# Altium PCB VA_HUB_PCB.PcbDoc (part 10 of 12)
Units mil, origin at the board's own origin, x right, y up, seen from the top; angles counter-clockwise.
Board outline 4408 x 3619 mil, 8 copper layers (Top Layer, Routing 1, Routing 2, Power Plane, GND Plane, Routing 3, Routing 4, Bottom Layer), stack 85.156 mil thick; 569 components, 440 nets, 2911 pads, 1518 vias.
Unrouted connection lines stored in the file: 46.
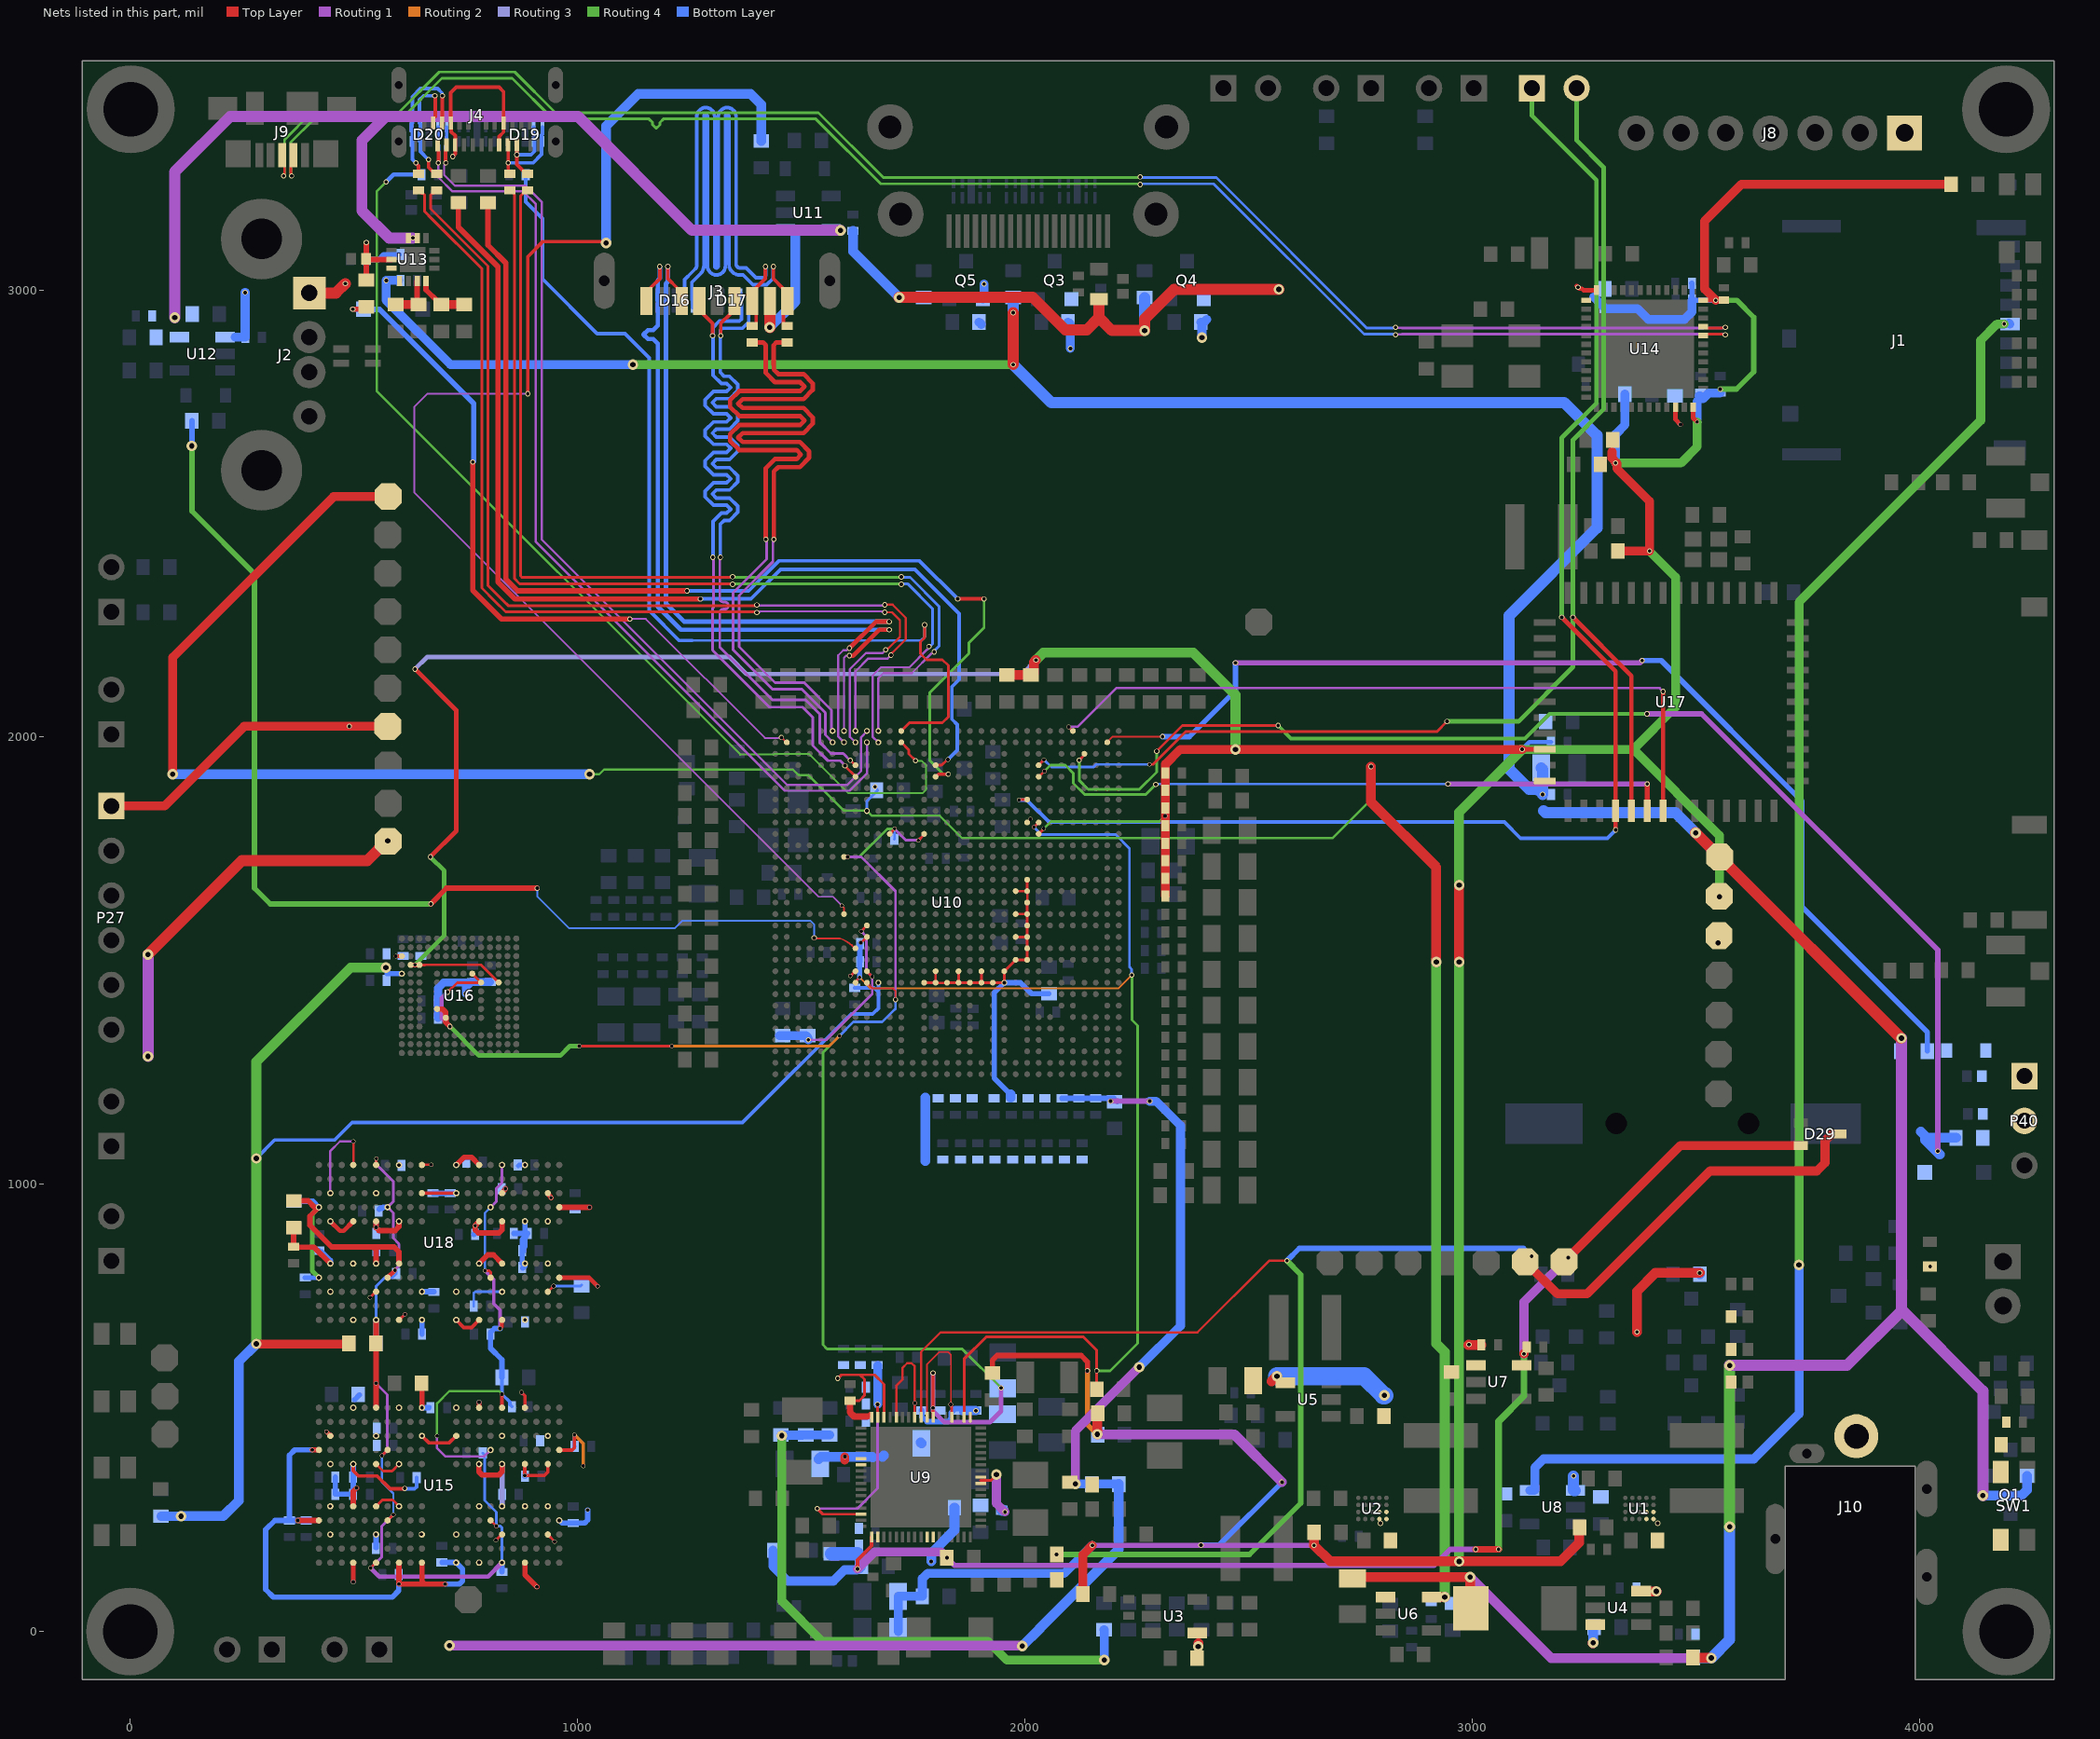
[diagram p13: the nets of this part, all layers, seen from the top]

## Via types
v1: diameter 9.84, hole 7.87, Top Layer to Bottom Layer, 821 vias
v2: diameter 11.81, hole 7.87, Top Layer to Bottom Layer, 575 vias
v3: diameter 23.62, hole 11.81, Top Layer to Bottom Layer, 122 vias

## Nets (pads, with @x,y where several pads share a name; then routed paths per layer and width w, separated by ;. In a path a pad name is that pad's centre, name@x,y a point inside that pad or via, vN(x,y) a via of type N, cw(c..) or ccw(c..) an arc to the next point about the centre after c; other vN are vias at no path point) (continued)
TYPEC0_RX2_N: D20.1 D20.10 J4.A10 U10.AL23 | length 2183.5
  Top Layer w8: v2@705.36,3284.43 J4.A10@705.36,3310.64
  Routing 1 w5: v2(705.86,3283.93) 705.86,3282.09 701.86,3278.09 701.86,3256.96 725.82,3233 884.03,3233 920,3197.03 920,2442 1469,1893 1602.89,1893 1634.05,1924.16 1634.05,1999.83 1647.05,2012.83 v1(1647.05,2013.92)
  Bottom Layer w8: v2(705.86,3283.93) 704.86,3284.93 704.86,3321.42 707.69,3324.25 D20.1@707.69,3332 D20.10@707.69,3363.5
TYPEC0_RX2_P: D20.2 D20.9 J4.A11 U10.AK23 | length 2189.2
  Top Layer w8: v2@689.36,3287.13 J4.A11@689.36,3310.09
  Routing 1 w5: v2(688.86,3283.93) 688.86,3251.58 720.44,3220 878.64,3220 907,3191.64 907,2436.62 1463.62,1880 1608.27,1880 1647.05,1918.78 v1(1647.05,1988.08)
  Bottom Layer w8: D20.9@688,3363.5 D20.2@688,3332 688,3324.25 D20.2@688.86,3323.39 ; v2@689.86,3283.93 D20.2@689.86,3323.39
TYPEC0_SBU1: C167.1 U10.AK20 | length 2303.2
  Top Layer w6: U10.AK20@1723.82,1988.18 1741,1971.01 1741,1962 v2(1756,1947)
  Routing 4 w4: 1364,1961 1438.7,1961 1439.7,1962 1518,1962 1605,1875 1772,1875 1779.5,1882.5 1779.5,1936.5 1769,1947 v2(1756,1947)
  Routing 4 w5: v2(572,3241) 551,3220 551,2774 1364,1961
  Bottom Layer w10: v2(572,3241) 588.82,3257.82 C167.1@651.32,3257.82
TYPEC0_SBU1_DC: R86.1 U10.AH17 | length 2378.1
  Top Layer w6: U10.AH17@1800.59,1937 1813.95,1937 1825.79,1948.85 1827.26,1948.85 v1(1828,1949.58)
  Top Layer w12: R86.1@733.82,3194.82 733.82,3140.18 822.39,3051.61 822.39,2346.57 860.18,2308.78 v2@1274.22,2308.78
  Bottom Layer w8: v2(1275,2309) 1388.07,2309 1454.07,2375 1754,2375 1853,2276 1853,2128.5 1837,2112.5 1837,2040 1849,2028 1849,1970.58 1841.58,1963.17 v1(1828,1949.58)
TYPEC0_SBU2: C168.1 U10.AL20 | length 2174.2
  Top Layer w6: U10.AL20@1723.82,2013.77 1742.05,2032 1816,2032 1829,2045 1829,2160 1816,2173 1780,2173 1767,2186 1767,2213.39 1776,2222.39 v2(1776,2251)
  Bottom Layer w6: 1256,2216 1768.31,2216 1776,2223.69 v2(1776,2251)
  Bottom Layer w8: C168.1@884.32,3257.82 884.32,3196.68 921.56,3159.44 921.56,3024.44 1044,2902 1106,2902 1160,2848 1160,2283 1227,2216 1256,2216
TYPEC0_SBU2_DC: R87.1 U10.AG17 | length 2497.7
  Top Layer w8: U10.AG17@1800.59,1911.41 1801.95,1911.41 1807.53,1917 v2(1829,1917) ; v2(1850,2309) v2(1909,2309)
  Top Layer w12: R87.1@799.82,3194.82 799.82,3100.18 840,3060 840,2353 866.22,2326.78 v2(1245,2326.78)
  Routing 4 w6: v2(1829,1917) 1828.96,1917.04 1817.96,1917.04 1787.93,1947.07 1787.93,2099.93 1875,2187 1875,2210.78 1909,2244.78 v2(1909,2309)
  Bottom Layer w8: v2(1245,2326.78) 1382.78,2326.78 1450,2394 1765,2394 v2(1850,2309)
TYPEC0_TX1_N: C169.1 U10.AK22 | length 2230.5
  Top Layer w6: C169.1@848.82,3222.32 852.32,3222.32 858.32,3216.32 858.32,3213.48 859,3212.81 859,2354.49 870.72,2342.78 1339,2342.78 1339.15,2342.63 1345.9,2342.63 v2(1346.85,2341.68)
  Routing 1 w5: v1(1672.64,1987.93) 1672.64,1988.18 1659.64,2001.18 1659.64,2137.03 1678.62,2156 1742.21,2156 1782.62,2196.42
  Routing 4 w6: v2(1346.85,2341.68) 1347.8,2342.63 1352.07,2342.63 1352.37,2342.92 1525.26,2342.92 1716,2342.92 1716.29,2342.63 1722.89,2342.63 v2(1724,2341.52)
  Bottom Layer w6: v2(1724,2341.52) 1725.11,2342.63 1729.22,2342.63 1729.51,2342.92 1737.91,2342.92 1794.05,2286.77 1794.05,2208.67 1790.54,2205.15 1790.23,2205.15 1787.33,2202.24 v2(1785.76,2202.24)
TYPEC0_TX1_P: C170.1 U10.AL22 | length 2203.1
  Top Layer w6: C170.1@888.82,3222.32 885.32,3222.32 873,3210 873,2360.29 876.51,2356.78 1339,2356.78 1339.6,2357.38 1345.89,2357.38 v2(1347,2358.49)
  Routing 1 w5: v1(1672.64,2013.77) 1672.81,2013.94 1672.81,2019.64 1672.64,2019.81 1672.64,2131.64 1684,2143 1747.59,2143 1791.82,2187.23
  Routing 4 w6: v2(1347,2358.49) 1348.11,2357.38 1352.06,2357.38 1352.52,2356.92 1519.46,2356.92 1716,2356.92 1716.29,2357.22 1722.89,2357.22 v2(1724,2358.33)
  Bottom Layer w6: v2(1724,2358.33) 1725.11,2357.22 1729.22,2357.22 1729.51,2356.92 1743.7,2356.92 1808.05,2292.57 1808.05,2202.87 1800.55,2195.36 1800.55,2194.84 1797.64,2191.93 v2(1797.64,2190.36)
TYPEC0_TX2_N: C171.1 U10.AK24 | length 2262.9
  Top Layer w5: v2(1687,2279) 1703,2279 1720.85,2261.15 1720.85,2224.15 1694.83,2198.13 1693.97,2198.13 1690.84,2195 v2(1689,2195)
  Top Layer w6: C171.1@644.82,3221.5 650.82,3215.5 654.4,3215.5 657.91,3211.99 657.91,3175.47 675.36,3158.02 786,3047.38 786,2333.2 815.1,2304.1 839.2,2280 v2@1401,2280
  Routing 1 w5: v2(1401,2278.59) 1402.3,2279.9 1406.73,2279.9 1407.94,2281.1 1680.67,2281.1 1681.46,2280.3 1685.7,2280.3 v2(1687,2279) ; v1(1621.46,1988.08) 1621.46,1988.18 1609,2000.64 1609,2152 1645,2188 1682,2188 v2(1689,2195)
TYPEC0_TX2_P: C172.1 U10.AL24 | length 2233.4
  Top Layer w5: v2(1687,2295.81) 1704.57,2295.81 1733.85,2266.54 1733.85,2218.77 1704.02,2188.94 1704.02,2188.09 1700.89,2184.96 v2(1700.89,2183.11)
  Top Layer w6: C172.1@685,3221.5 679,3215.5 675.43,3215.5 671.91,3211.99 671.91,3181.27 689.36,3163.82 800,3053.18 800,2339 834.9,2304.1 845,2294 v2@1401,2294
  Routing 1 w5: v2(1401,2295.41) 1402.3,2294.1 1680.67,2294.1 1681.07,2294.51 1685.7,2294.51 v2(1687,2295.81) ; v1(1621.46,2013.92) 1621.46,2146.84 1650.16,2175.54 1693.31,2175.54 v2(1700.89,2183.11)
TYPEC0_U2VBUSDET: D22.2 R85.1 U10.AK30 | length 1651.7
  Top Layer w4: v2(1456,1999) 1456.55,1999 1467.37,1988.18 U10.AK30@1467.92,1988.18
  Top Layer w12: v2(497.82,2956.82) 522.82,2956.82 R85.1@527.82,2961.82 ; v2(766,2615) 766,2328 830,2264 v2@1116.83,2264
  Routing 1 w4: v2(1117,2264) 1153,2264 1419,1998 1455,1998 v2(1456,1999)
  Bottom Layer w12: v2(497.82,2956.82) D22.2@521.88,2956.82 522.28,2956.42 557.58,2956.42 768,2746 768,2617 v2(766,2615)
TYPEC0TX1_N: C169.2 D19.1 D19.10 J4.A3 | length 210
  Top Layer w8: J4.A3@844.72,3323.89 845.1,3323.51 v2(845.1,3284) 845.1,3263.05 C169.2@848.82,3259.32
  Bottom Layer w8: v2(845.1,3284) 900.63,3284 919.84,3303.21 919.84,3345.91 921.68,3347.75 D19.10@921.68,3363.5
TYPEC0TX1_P: C170.2 D19.2 D19.9 J4.A2 | length 173.8
  Top Layer w8: J4.A2@864.41,3323.89 v2(864.41,3302.07) 864.41,3280.24 885.32,3259.32 C170.2@888.82,3259.32
  Bottom Layer w8: v2(864.41,3302.07) 896.07,3302.07 903.84,3309.84 903.84,3332 903.84,3345.91 902,3347.75 D19.9@902,3363.5
TYPEC0TX2_N: C171.2 D20.5 D20.6 J4.B3 | length 325.7
  Top Layer w8: v2(638.69,3283.93) 638.69,3283.62 644.82,3277.48 C171.2@644.82,3259.32 ; J4.B3@697.08,3373.11 698,3374.02 v2(698,3434)
  Bottom Layer w8: v2(638.69,3283.93) 630.79,3291.83 630.79,3332 630.79,3353.91 628.94,3355.75 628.94,3371.24 630.79,3373.09 630.79,3431.74 649.05,3450 687.63,3450 697.27,3440.36 697.27,3434.73 v2(698,3434)
TYPEC0TX2_P: C172.2 D20.4 D20.7 J4.B2 | length 295.9
  Top Layer w8: v2(667,3291) 667,3273.82 681.5,3259.32 C172.2@685,3259.32 ; J4.B2@678.32,3362.34 678.32,3383.87 682,3387.55 682,3433 v2(681,3434)
  Bottom Layer w8: D20.4@646.79,3332 646.79,3353.91 648.63,3355.75 D20.7@648.63,3363.5 648.63,3371.24 646.79,3373.09 646.79,3425.11 655.68,3434 v2(681,3434) ; D20.4@648.63,3332 648.63,3309.37 v2(667,3291)
TYPEC1_N: D17.1 D17.10 J3.2 U10.AH24 | length 1744.3
  Top Layer w6: v2(1609.89,1947.89) 1610.23,1947.89 1621.12,1937 U10.AH24@1621.46,1937
  Top Layer w8: v2(1320.11,2897.57) 1320.11,2924.77 J3.2@1341.41,2946.07
  Routing 1 w6: v2(1319.52,2402) 1318.4,2400.89 1318.4,2396.78 1318.11,2396.49 1318.11,2365 1318.11,2310 ccw(c1326.11,2310) 1326.11,2302 1329,2302 cw(c1329,2294) 1329,2286 1326.11,2286 ccw(c1326.11,2278) 1318.11,2278 1318.11,2259 1318.11,2200.89 1436,2083 1509.8,2083 1542,2050.8 1542,1987.8 1566.7,1963.1 1594.1,1963.1 1609.31,1947.89 v2(1609.89,1947.89)
  Bottom Layer w8: 1319.11,2408 1319.11,2432.91 1319.11,2475.59 1328.11,2484.59 1340.11,2484.59 1358.48,2502.97 1358.48,2516.22 1340.11,2534.59 1310.57,2534.59 1301.57,2543.59 1310.57,2552.59 1340.11,2552.59 1358.48,2570.97 1358.48,2584.22 1340.11,2602.59 1310.57,2602.59 1301.57,2611.59 1310.57,2620.59 1340.11,2620.59 1358.48,2638.97 1358.48,2652.22 1340.11,2670.59 1310.57,2670.59 1301.57,2679.59 1310.57,2688.59 1340.11,2688.59 1358.48,2706.97 1358.48,2720.22 1340.11,2738.59 1310.57,2738.59 1301.57,2747.59 1310.57,2756.59 1340.11,2756.59 1358.48,2774.97 1358.48,2788.22 1340.11,2806.59 1328.11,2806.59 1319.11,2815.59 1319.11,2871 1319.11,2893.88 1320.11,2894.88 v2(1320.11,2897.57) 1319.11,2898.57 1319.11,2909.26 1323.8,2913.95 1368.61,2913.95 1382.67,2928.01 1382.67,2974.23 1384.51,2976.07 D17.10@1384.51,2991.82
TYPEC1_P: D17.2 D17.9 J3.3 U10.AG24 | length 1750.5
  Top Layer w6: v2(1598,1936) 1598,1935.44 1621.46,1911.98 U10.AG24@1621.46,1911.41
  Top Layer w8: J3.3@1282.23,2944.65 1302.11,2924.77 v2(1302.11,2897.57)
  Routing 1 w6: v2(1302.7,2402) 1303.82,2400.89 1303.82,2396.78 1304.11,2396.49 1304.11,2289.94 1302.11,2287.94 1302.11,2194.26 1429.37,2067 1503.17,2067 1526,2044.17 1526,1981.17 1560.07,1947.1 1587.47,1947.1 1598,1936.57 v2(1598,1936)
  Bottom Layer w8: 1303.11,2408 1303.11,2432.91 1303.11,2482.22 1321.48,2500.59 1333.48,2500.59 1342.48,2509.59 1333.48,2518.59 1303.94,2518.59 1285.57,2536.97 1285.57,2550.22 1303.94,2568.59 1333.48,2568.59 1342.48,2577.59 1333.48,2586.59 1303.94,2586.59 1285.57,2604.97 1285.57,2618.22 1303.94,2636.59 1333.48,2636.59 1342.48,2645.59 1333.48,2654.59 1303.94,2654.59 1285.57,2672.97 1285.57,2686.22 1303.94,2704.59 1333.48,2704.59 1342.48,2713.59 1333.48,2722.59 1303.94,2722.59 1285.57,2740.97 1285.57,2754.22 1303.94,2772.59 1333.48,2772.59 1342.48,2781.59 1333.48,2790.59 1321.48,2790.59 1303.11,2808.97 1303.11,2871 1303.11,2896.57 v2(1302.11,2897.57) 1302.11,2900.26 1303.11,2901.26 1303.11,2915.89 1317.17,2929.95 1361.98,2929.95 1366.67,2934.63 1366.67,2974.23 1364.82,2976.07 D17.9@1364.82,2991.82
TYPEC1_RX1_N: D16.5 D16.6 J3.5 U10.AL25 | length 1723.2
  Top Layer w8: J3.5@1154.34,2974.89 1164.12,2984.66 1164.12,3005.12 1184,3025 v2(1184,3052.2)
  Top Layer w10: v2(1608,2182) 1608.28,2181.72 1616.36,2181.72 1674.64,2240 v2(1697,2240)
  Routing 1 w5: v1(1595.87,2013.92) 1595.87,2106.11 1595.94,2106.17 1595.94,2177.34 1600.6,2182 v2(1608,2182)
  Bottom Layer w10: v2(1184,3052.2) 1184,3025.48 1179.61,3021.09 1179.61,2992.66 D16.6@1178.77,2991.82 1178.77,2976.07 1179.61,2975.23 1179.61,2926 1179.61,2920 1169.61,2910 1157.38,2910 1147.38,2900 1157.38,2890 1169.61,2890 1179.61,2880 1179.61,2875 1179.61,2830 1179.61,2675.21 1179.61,2291.54 1231.15,2240 v2(1697,2240)
TYPEC1_RX1_P: D16.4 D16.7 J3.6 U10.AK25 | length 1725.4
  Top Layer w8: v2(1202,3052.2) 1202,3025 1223.3,3003.7 1223.3,2984.66 J3.6@1233.08,2974.89 J3.6@1233.08,2957.17
  Top Layer w10: v2(1608,2198.81) 1667.19,2258 v2(1697,2258)
  Routing 1 w5: v1(1595.87,1988.08) 1595.87,1988.18 1583,2001.05 1583,2093.24 1582.87,2093.24 1582.87,2111.49 1582.94,2111.56 1582.94,2182.72 1594.44,2194.22 1601.67,2194.22 1606.25,2198.81 v2(1608,2198.81)
  Bottom Layer w10: v2(1202,3052.2) 1202,3018.02 1197.61,3013.63 1197.61,2992.66 D16.7@1198.45,2991.82 1198.45,2976.07 1197.61,2975.23 1197.61,2830 1197.61,2675.21 1197.61,2299 1238.61,2258 v2(1697,2258)
TYPEC1_TX1_N: C159.1 U10.AK26 | length 1800.1
  Top Layer w10: C159.1@1390.82,2882.32 1414.96,2882.32 1420.82,2876.46 1420.82,2832 1420.82,2824.42 1420.91,2824.33 1420.91,2814.27 1441.46,2793.73 1497.79,2793.73 1507.79,2783.73 1497.79,2773.73 1361.63,2773.73 1341.09,2753.18 1341.09,2738.27 1361.63,2717.73 1497.79,2717.73 1507.79,2707.73 1497.79,2697.73 1361.63,2697.73 1341.09,2677.18 1341.09,2662.27 1361.63,2641.73 1489.68,2641.73 1499.68,2631.73 1489.68,2621.73 1441.46,2621.73 1420.91,2601.18 1420.91,2462.21 1421,2462.13 1421,2462 v2(1421,2442)
  Routing 1 w6: v2(1421,2442) 1422.11,2440.89 1422.11,2436.78 1423,2435.89 1423,2398 1348,2323 1348,2195 1389.98,2153.02 1435.56,2107.44 1500.92,2107.44 1554,2054.36 1554,2004.82 1570.28,1988.54 v1(1570.28,1988.08)
TYPEC1_TX1_P: C160.1 U10.AL26 | length 1768.6
  Top Layer w10: v2(1439,2442) 1439,2462 1439,2469.58 1438.91,2469.67 1438.91,2593.73 1448.91,2603.73 1497.13,2603.73 1517.68,2624.27 1517.68,2639.18 1497.13,2659.73 1369.09,2659.73 1359.09,2669.73 1369.09,2679.73 1505.25,2679.73 1525.79,2700.27 1525.79,2715.18 1505.25,2735.73 1369.09,2735.73 1359.09,2745.73 1369.09,2755.73 1505.25,2755.73 1525.79,2776.27 1525.79,2791.18 1505.25,2811.73 1448.91,2811.73 1438.91,2821.73 1438.91,2831.79 1438.82,2831.87 1438.82,2832 1438.82,2876.46 1444.68,2882.32 C160.1@1468.82,2882.32
  Routing 1 w6: v2(1439,2442) 1437.89,2440.89 1437.89,2436.78 1437,2435.89 1437,2392.2 1361.56,2316.76 1361.56,2310 1361.56,2219.67 1361.56,2201.69 1441.81,2121.44 1506.72,2121.44 1568,2060.15 1568,2017.09 1570.28,2014.81 v1(1570.28,2013.92)
TYPEC1TX1_N: C159.2 D16.2 D16.9 J3.8 | length 1797.4
  Top Layer w8: J3.8@1390.56,2974.89 1399.32,2966.13 1399.32,2924.32 1394.32,2919.32 C159.2@1390.82,2919.32 ; J3.8@1400.1,3004.88 1419.98,3024.76 v2@1419.98,3051.96
  Bottom Layer w8: D16.2@1237.82,2960.33 1237.82,2976.07 1239.67,2977.92 1239.67,3023.12 1256.67,3040.12 1262.99,3046.44 ccw(c1254.19,3055.3) 1266.67,3055.3 1266.67,3387.32 cw(c1286.67,3387.32) 1286.67,3407.32 cw(c1286.67,3387.32) 1306.67,3387.32 1306.67,3053.26 ccw(c1310.67,3053.26) 1310.67,3049.26 ccw(c1310.67,3053.26) 1314.67,3053.26 1314.67,3387.32 cw(c1334.67,3387.32) 1334.67,3407.32 cw(c1334.67,3387.32) 1354.67,3387.32 1354.67,3057.26 ccw(c1362.67,3057.26) 1362.67,3049.26 1376.76,3049.26 1398.7,3027.31 1403.16,3027.31 1416.41,3027.31 1421.1,3032 1421.1,3051.08 v2(1420.1,3052.08)
TYPEC1TX1_P: C160.2 D16.1 D16.10 J3.9 | length 1800.2
  Top Layer w8: v2@1437.98,3051.96 1437.98,3024.76 J3.9@1459.28,3003.46 ; C160.2@1468.82,2919.32 1465.32,2919.32 1460.32,2924.32 1460.32,2965.9 J3.9@1469.3,2974.89
  Bottom Layer w8: D16.1@1257.51,2960.33 1257.51,2976.07 1255.67,2977.92 1255.67,3016.49 1256.67,3017.5 1274.3,3035.12 ccw(c1254.19,3055.3) 1282.67,3055.3 1282.67,3387.32 cw(c1286.67,3387.32) 1286.67,3391.32 cw(c1286.67,3387.32) 1290.67,3387.32 1290.67,3053.26 ccw(c1310.67,3053.26) 1310.67,3033.26 ccw(c1310.67,3053.26) 1330.67,3053.26 1330.67,3387.32 cw(c1334.67,3387.32) 1334.67,3391.32 cw(c1334.67,3387.32) 1338.67,3387.32 1338.67,3057.26 ccw(c1362.67,3057.26) 1362.67,3033.26 1370.13,3033.26 1392.08,3011.31 1403.16,3011.31 1423.04,3011.31 1437.1,3025.37 1437.1,3048.39 1438.1,3049.39 v2(1438.1,3052.08)
UART0.UART0_CTS: U10.AG8 U17.42 | length 1480.8
  Top Layer w6: U10.AG8@2030.91,1911.41 2031.58,1911.41 v1(2043.7,1923.53)
  Top Layer w12: U17.42@3391.67,1835.12 v2(3391.67,1895)
  Routing 1 w12: v2(2946,1895) v2(3391.67,1895)
  Routing 4 w6: v1(2043.7,1923.53) 2057.18,1937 2090.6,1937 2108.41,1919.19 2108.41,1896.83 2133.24,1872 2271,1872 v2(2293,1894)
  Bottom Layer w6: v2(2293,1894) 2294,1895 v2(2946,1895)
UART0.UART0_RTS: U10.AL5 U17.43 | length 1649.2
  Top Layer w6: v1(2097.82,2022.82) 2106.87,2013.77 U10.AL5@2107.68,2013.77
  Top Layer w10: U17.43@3427.11,1835.12 v2(3427.11,2101.91) v2@3427.11,2102.36
  Routing 1 w5: v1(2097.82,2022.82) 2117.82,2022.82 2204.5,2109.5 3419.51,2109.5 v2(3427.11,2101.91)
UART0.UART0_RXD: P39.1 U10.AE9 U17.40 | length 3196.1
  Top Layer w6: v1(1986.93,1859.42) 1987.33,1859.83 2004.91,1859.83 U10.AE9@2005.32,1860.23
  Top Layer w10: v2(3200.33,2267.82) 3320.81,2147.35 U17.40@3320.81,1835.12 v2@3320.81,1792.42
  Routing 4 w10: P39.1@3133.82,3450.82 3133.82,3389.18 3278,3245 3278,2746.77 3200.33,2669.11 v2(3200.33,2267.82)
  Bottom Layer w8: v1(1986.93,1859.42) 2004.58,1859.42 2054.16,1809.84 3072.16,1809.84 3108.18,1773.82 3302.36,1773.82 v2(3320.96,1792.42)
UART0.UART0_TXD: P39.2 U10.AH8 U17.41 | length 3133.9
  Top Layer w6: U10.AH8@2030.91,1937 2043,1949.1 v1(2043,1949.38) ; v1(2278.82,1938.82) 2286.46,1938.82 2359.54,2011.91 2920.91,2011.91 v2(2944,2035)
  Top Layer w10: v2(3225.39,2267.82) 3356.24,2136.97 U17.41@3356.24,1835.12
  Routing 4 w10: v2(2944,2035) 3104,2035 3225.39,2156.39 v2(3225.39,2267.82) 3225.39,2664.39 3294,2733 3294,3274 3233.82,3334.18 P39.2@3233.82,3450.82
  Bottom Layer w6: v1(2043,1949.38) 2059.28,1933.09 2153.72,1933.09 2159.45,1938.82 v1(2278.82,1938.82) v1@2279,1938.82
UART2_RXD: D32.1 D34.1 P40.1
UART2_TXD: D33.1 P40.2 R116.1
UART2DBG.UART2DBG_RX: D34.2 R118.2 U10.AK2 | length 2470.4
  Top Layer w4: U10.AK2@2184.45,1988.45 2197,2001 v2(2307.95,2001.05) v2(2307.95,2001.05)
  Top Layer w5: U10.AK2@2184.45,1988.18 U10.AK2@2184.45,1988.45
  Routing 1 w12: v2(2470.99,2165.99) 3374.99,2165.99 v2(3380,2171)
  Routing 4 w8: v2(2307.95,2001.05) v2(2307.95,2001.05)
  Bottom Layer w12: v2(2307.95,2001.05) 2308,2001 2368,2001 2470.99,2103.99 v2(2470.99,2165.99) ; v2(3380,2171) 3423,2171 3737,1857 3737,1621 4017.82,1340.18 R118.2@4017.82,1297.82
UART2DBG.UART2DBG_TX: D31.2 R116.2 U10.AJ4 | length 2914.2
  Top Layer w6: v2(2121.62,1948.09) U10.AJ4@2134.46,1960.93 ; v2@2294.85,1968.3 2352.56,2026 v2(2566.24,2026)
  Routing 1 w12: v2(3391,2052) 3513,2052 4041,1524 v2(4041,1074)
  Routing 4 w6: v2(2121.62,1948.09) 2121.62,1903.38 2142,1883 2256,1883 2294.78,1921.78 v2(2294.85,1968.27) v2(2294.85,1968.27)
  Routing 4 w8: v2(2566.24,2026) 2595.24,1997 3118,1997 3173,2052 v2(3391,2052)
  Bottom Layer w22: 4002.82,1117.82 4012.57,1108.07 4012.57,1099.57 4045.32,1066.82 ; 4016.82,1103.82 R116.2@4081.82,1103.82
USB_CON_SCL: SB26.1 SB27.1 U13.6 | length 89.2
  Top Layer w12: 641.57,2981.82 641.67,2981.92 U13.6@641.67,3019.99
  Top Layer w20: SB27.1@593.82,2966.82 SB26.1@644.82,2966.82
USB_CON_SDA: SB24.1 SB25.1 U13.7 | length 96.8
  Top Layer w12: U13.7@661.35,3019.99 661.44,3019.89 661.44,3000.2 SB25.1@686.85,2974.79
  Top Layer w20: SB25.1@705.82,2966.82 SB24.1@746.82,2966.82
USBA_N: J9.2 U14.32 | length 3700.1
  Top Layer w6: 359,3260.76 359,3272.32 359.28,3272.59 359.28,3295.24 J9.2@365.14,3301.1 ; U14.32@3516.82,2897.88 3519.66,2900.72 3557,2900.72 3557.29,2900.43 3564.89,2900.43 v2(3566,2899.31)
  Routing 1 w6: v2(2829,2899.31) 2830.11,2900.43 2842.71,2900.43 2843,2900.72 3560.49,2900.72 3560.78,2900.43 3564.89,2900.43 v2(3566,2899.31)
  Routing 4 w6: v2(361,3254.65) 359.89,3255.76 359.89,3259.87 359,3260.76 359,3330 411,3382 605.8,3382 696.8,3473 854.07,3473 945.07,3382 1141,3382 1160,3382 1168,3374 1168,3369.1 1176,3361.1 1184,3369.1 1184,3374 1192,3382 1244,3382 1533,3382 1678,3237 2252.49,3237 2252.78,3236.71 2256.89,3236.71 v2(2258,3235.59)
  Bottom Layer w6: v2(2258,3235.59) 2258,3237 2422.2,3237 2758.48,2900.72 2823.49,2900.72 2823.78,2900.43 2827.89,2900.43 v2(2829,2899.31)
USBA_P: J9.3 U14.33 | length 3699.9
  Top Layer w6: J9.3@339.55,3301.1 345,3295.64 345,3260.76 ; U14.33@3516.82,2917.56 3519.66,2914.72 3557,2914.72 3557.29,2915.01 3564.89,2915.01 v2(3566,2916.13)
  Routing 1 w6: v2(2829,2916.13) 2830.11,2915.01 2842.71,2915.01 2843,2914.72 3560.49,2914.72 3560.78,2915.01 3564.89,2915.01 v2(3566,2916.13)
  Routing 4 w6: v2(343,3254.65) 344.11,3255.76 344.11,3259.87 345,3260.76 345,3335.8 405.2,3396 600,3396 691,3487 859.87,3487 950.87,3396 1141,3396 1538.8,3396 1683.8,3251 2252.49,3251 2252.78,3251.29 2256.89,3251.29 v2(2258,3252.41)
  Bottom Layer w6: v2(2258,3252.41) 2258,3251 2428,3251 2764.28,2914.72 2823.49,2914.72 2823.78,2915.01 2827.89,2915.01 v2(2829,2916.13)
VBST: C8.1 U4.6 | length 34
  Top Layer w22: U4.6@3378,90.22 3378.41,89.82 v3(3411.82,89.82)
VBUS_TYPEC0: C157.1 C161.1 C166.1 ESD2.1 J4.A4 J4.A9 J4.B4 J4.B9 R85.2 U12.1 U13.2 | length 779.7
  Top Layer w8: v2(721,3298) 727,3304 727,3323.5 J4.A9@726.61,3323.89 726.61,3344.61 717.69,3353.53 717.69,3372.18 J4.B4@716.77,3373.11 716.77,3440.77 729,3453 825,3453 834.88,3443.12 J4.B9@834.88,3373.11 834.7,3372.93 834.7,3352.63 825.04,3342.96 J4.A4@825.04,3323.89 J4.A4@825.83,3324.69
  Top Layer w12: R85.2@527.82,3021.82 527.69,3021.96 ESD2.1@527.69,3068.69 ; v2(527.82,3105.82) 527.82,3069.09 ESD2.1@527.55,3068.82 ESD2.1@527.69,3068.69 ; U13.2@583.99,3067.82 528.55,3067.82 ESD2.1@527.69,3068.69
  Bottom Layer w12: v2(527.82,3105.82) 528.32,3105.32 C166.1@528.32,3067.82 555.82,3067.82 566.82,3078.82 C161.1@600.82,3078.82
  Bottom Layer w20: 234.84,2894.2 257.3,2894.2 257,2894.5 v2(257,2994)
VCAP_1: C180.1 U14.22 | length 43.2
  Top Layer w10: U14.22@3454.81,2737.44 3454.81,2709.83 v1(3465.82,2698.82)
VCC1V8_DDR: C196.1 C197.1 C198.1 C199.1 C216.1 C217.1 C218.1 C219.1 R105.1 U15.F1 U15.F12 U15.G4 U15.G9 U15.T4 U15.T9 U15.U1 U15.U12 U18.F1 U18.F12 U18.G4 U18.G9 U18.T4 U18.T9 U18.U1 U18.U12 | length 2940.7
  Top Layer w5: U18.F12@550.13,1043.13 v1(550.13,1057.27)
  Top Layer w6: v1(537.42,141.92) 549.52,154.02 U15.F1@549.87,154.02 ; v1(562.92,393.19) 562.92,393.32 575.46,405.86 U15.G9@575.46,405.98 ; U15.G4@575.46,248.5 v1(588.25,261.3) ; v1(792.98,806.92) 802.49,806.92 806,803.41 U18.T4@806,792 ; U15.T4@805.77,248.5 v1(818.57,235.71)
  Top Layer w8: v1(826.72,677.42) 831.36,682.07 U18.U1@831.36,696.77 ; U15.U12@831.36,500.47 v1(831.36,530.67)
  Top Layer w10: U18.G4@575.46,791.26 v1(592,807.8)
  Top Layer w12: U15.F12@549.87,500.47 v1(549.87,555) 549.87,643.13 R105.1@549,644 549.87,644.87 v1(549.87,696.77)
  Routing 1 w5: v1(686,437.61) 686,410 704.1,391.9 791.81,391.9 v1(805.77,405.86)
  Routing 1 w6: v1(537.42,141.92) 537.77,141.92 562.39,166.54 562.39,235.44 v1(588.25,261.3) ; v1(549.87,555) 575,529.87 575,405.27 v1(562.92,393.19) ; v1(550.13,1057.27) 550.13,1044.14 588,1006.27 588,961.41 v1(575.46,948.87) 588.13,936.2 588.13,879.47 601,866.6 601,817.84 592,808.84 v1(592,807.8) ; v1(805.77,948.74) 818.94,961.91 818.94,990.94 831.36,1003.36 v1(831.36,1043.23)
  Routing 1 w8: v1(792.98,806.92) 813,786.9 813,732.5 826.72,718.78 v1(826.72,677.42)
  Routing 1 w10: v1(537.42,141.92) 556.34,123 800.35,123 831.11,153.76 v1(831.11,154.02)
  Routing 4 w5: v1(686,437.61) 686,510 713.5,537.5 824.54,537.5 v1(831.36,530.67)
  Routing 4 w6: v1@562.66,392.93 v1(562.92,393.19)
  Bottom Layer w5: v1(562.92,393.19) 562.92,334.08 588.25,308.75 v1(588.25,261.3) ; v1@793.1,807.05 793.1,865.67 793.02,865.75 793.02,936.02 v1(805.77,948.74)
  Bottom Layer w6: v1(549.87,696.77) 549.87,771.87 569,791 586,791 594.5,799.5 C217.1@594.5,801 594.5,805.3 v1(592,807.8) ; C197.1@788.5,399 792.6,394.9 792.6,293.17 818.57,267.2 v1(818.57,235.71) 827.6,235.71 831.11,232.19 v1(831.11,154.02)
  Bottom Layer w8: C196.1@831,568 831.36,567.64 v1(831.36,530.67) ; v1@831.71,530.32 848.5,513.54 848.5,508 C199.1@853.5,503
  Bottom Layer w12: C216.1@549,644 549.87,644.87 v1(549.87,696.77) ; C218.1@556.5,943.93 556.5,944.5 558.5,946.5 563.16,946.5 565.53,948.87 v1(575.46,948.87) ; C219.1@805.5,665 805.5,633.5 831,608 C196.1@831,568 ; C219.1@806.08,669.08 814.42,677.42 v1(826.72,677.42) ; C198.1@831,133.5 831,136.14 831.36,136.5 831.36,153.76 v1(831.11,154.02)
VCC3V0_SD: C29.1 J1.4 U8.5 | length 3342.3
  Routing 4 w20: v3(3730.82,819.82) 3730.82,2301.82 4137,2708 4137,2887 4173.82,2923.82 v2(4189.82,2923.82)
  Bottom Layer w20: U8.5@3128.64,315.22 3128.82,315.4 3139.41,315.4 3140.82,316.82 3140.82,366.82 3159.82,385.82 3629.82,385.82 3730.82,486.82 v3(3730.82,819.82) ; J1.4@4200.1,2925.82 J1.4@4202.41,2923.5
VCC3V3_S3: C49.2 C53.1 C54.1 C153.1 U9.7 U10.AB18 U10.AB21 U10.J23 U10.Y25 U16.E6 U16.F5 U16.J10 U16.K9 | length 3625.5
  Top Layer w4: U10.J23@1647.05,1450.78 1659.83,1438 1705,1438 1711,1432 v2(1711,1413)
  Top Layer w6: v2(709.82,1430) 730.83,1451 U16.E6@784.32,1451 ; U16.F5@764.77,1470.82 U16.E6@783.77,1451.82 ; v1(1004,1309) v1(1211,1309) ; U10.AB21@1698.23,1783.46 1698.23,1783.77 1709,1794.54 v1(1709,1794.84) ; v1(1762.21,1769.16) 1775,1781.95 U10.AB18@1775,1783.46 ; v2(1795,578) 1795.21,577.79 1795.21,479.26 U9.7@1795.43,479.05
  Top Layer w10: U16.E6@783.77,1451.82 U16.E6@784.82,1451.82 ; U16.E6@784.32,1451 U16.E6@784.45,1451.14
  Top Layer w12: U16.K9@686.03,1392.08 686.37,1391.74 698.68,1391.74 705.71,1384.71 U16.J10@705.71,1372.4 706.05,1372.06 706.05,1361.59 v2(714.82,1352.82)
  Routing 1 w6: v1(1604,1732) 1634.53,1732 1711,1655.53 v2(1711,1413) ; v1(1709,1794.84) 1734.69,1769.16 v1(1762.21,1769.16)
  Routing 1 w10: v2(709.82,1430) 696,1416.17 696,1371.64 v2(714.82,1352.82) ; v2(1795,578) 1795,493 1820,468 1922,468 1947,493 v2(1947,545)
  Routing 4 w6: v1(1586,1332) 1548.84,1294.84 1548.84,641.16 1558,632 1860,632 v2(1947,545) ; v1(1604,1732) 1629.89,1732 1692.73,1794.84 v1(1709,1794.84)
  Routing 4 w10: v2(714.82,1352.82) 779.64,1288 962,1288 983,1309 v1(1004,1309)
  Routing 2 w6: v1(1211,1309) 1563,1309 v1(1586,1332)
  Bottom Layer w6: v1(1586,1332) 1617,1363 1681.34,1363 1705.34,1387 1711,1392.66 v2(1711,1413) ; C153.1@1708.5,1772 1709,1772.5 v1(1709,1794.84)
  other v1: 1795,500
VCC3V3_S5: C25.1 C41.1 C42.1 C61.1 D7.1 D29.2 P15.1 R39.2 R48.2 U7.5 U9.35 U9.36 | length 3252.9
  Top Layer w8: v2(1626,140) 1626,160 1657.63,191.63 U9.35@1657.63,211.33 ; R39.2@1824.82,164.82 R39.2@1825.82,164.82 v2(1826,165)
  Top Layer w12: v2(3008.27,183.93) v2(3008.27,183.93)
  Top Layer w15: v2(3008.27,183.93) v2@3059,183.93
  Top Layer w20: v2(3116,621) v2@3116,622 ; P15.1@3196.64,836 v2(3215,836) 3465.64,1086.64 D29.2@3734.82,1086.64
  Routing 1 w12: v2(1826,165) 1843,148 2915,148 2951,184 3008.2,184 v2(3008.27,183.93)
  Routing 1 w20: v2(1626,140) 1663.83,177.83 1813.17,177.83 v2(1826,165) ; v2(3116,621) 3116,737 v2(3215,836)
  Routing 4 w15: v2(3059,184) 3059,470 3116,527 v2(3116,621)
  Bottom Layer w12: 1625.82,173.82 1627,175
  Bottom Layer w20: D7.1@1436.82,181.82 1436.82,146.18 1470,113 1572,113 1596.83,137.83 1596.83,137.88 1596.94,138 1624.14,138 1626,139.86 1629.82,139.86 1634.82,144.86 R48.2@1634.82,145.82 1634.82,148.32 R48.2@1629.32,153.82
  Bottom Layer w30: C61.1@1567.82,173.82 1625.82,173.82
VCC3V3_SYS: C7.1 C13.1 C16.1 C19.1 C24.1 C35.1 C36.1 C37.1 C38.1 C39.1 C40.1 C162.1 C246.1 C247.1 L3.2 LED2.1 LED3.1 LED4.1 P14.1 Q1.2 R14.2 R16.2 R22.2 R27.2 R91.1 R118.1 SW1.1 U5.4 U6.1 U8.1 U9.1 U9.4 U9.8 U9.10 U9.13 U9.16 U9.32 U13.3 U13.4 U17.36 | length 10064
  Top Layer w4: U9.8@1781.65,479.05 1781.65,597.65 1809,625 1829,625 1834.92,619.08 1834.92,508.06 v1(1834.63,507.77)
  Top Layer w5: U9.13@1712.75,479.05 1712.75,549.75 1727,564 1727,590 1737,600 1747,600 1754.09,592.91 U9.10@1754.09,479.05
  Top Layer w6: v2(1536,275) 1548.49,262.51 U9.32@1634.01,262.51 ; U9.16@1671,479.46 1671.21,479.66 1671.21,507.79 v2(1671,508) ; v1(1834.63,507.77) 1834.63,506.73 1836.77,504.59 U9.4@1836.77,479.05 ; U9.1@1878.1,479.05 U9.1@1878.1,487.31 ; v2@1889.33,492.33 v2(1890.82,493.82)
  Top Layer w22: 2551.82,559.82 2562.82,570.82 v3(2563.82,570.82) ; C16.1@2732.82,118.82 2735.82,121.82 v3(2995.82,121.82) 2995.82,53.4 L3.2@2997.4,51.82 ; R14.2@3493.82,-58.18 v3@3533.82,-58.18
  Top Layer w25: v2(1974,2833) v2(1974,2949) ; v3(3499.82,1785.82) P14.1@3553.82,1731.82 v3@3958.95,1326.69
  Routing 1 w6: v2(1536,275) 1626,275 1671,320 v2(1671,508)
  Routing 1 w22: v3(2995.82,121.82) 3176.82,-59.18 v3(3534.82,-59.18)
  Routing 1 w25: v3(3575.82,594.82) 3837.62,594.82 3959.82,717.02 3959.82,719.82 ; v3(3959.82,1326.69) 3959.82,719.82 ; v3(4141.82,303.82) 4141.82,537.82 3959.82,719.82
  Routing 4 w20: v3(1124,2833) v2(1974,2833)
  Routing 4 w25: v3(3575.82,234) v3(3575.82,594.82)
  Bottom Layer w12: C37.1@1768.68,494.32 C37.1@1769.25,493.75 ; C37.1@1769.82,494.32 1769.82,480.69 1781.52,469 1827.97,469 1835,476.03 1835,489 1844.5,498.5 1868,498.5 ; C36.1@1859,490.32 1863,494.32
  Bottom Layer w20: C162.1@600.64,3021 v2(572.5,3021) 572.5,2976.5 716,2833 v3(1124,2833) ; v2(1671,508) C38.1@1671,594.5 ; 1863,494.32 1890.32,494.32 v2(1890.82,493.82)
  Bottom Layer w22: C7.1@3495.82,-59.18 v3(3534.82,-59.18) ; v3(4141.82,303.82) 4227.94,303.82 4240.82,316.71 Q1.2@4240.82,348.14
  Bottom Layer w25: v2@1973.82,2833.18 v2(1974,2833) 2059,2748 3205.75,2748 3279.23,2674.52 3279.23,2468.05 3083,2271.82 3083,1927.9 3127.57,1883.32 3146.32,1883.32 v2(3157.82,1871.82) 3157.82,1927.82 C246.1@3154.82,1930.82 ; R91.1@1973.82,2982.82 1974,2982.64 v2(1974,2949) ; 3160.12,1835.12 3163.92,1831.32 3454.32,1831.32 v3(3499.82,1785.82) ; v2(3226.82,347.82) 3226.82,316.32 3227.92,315.22 U8.1@3231,315.22 ; v3(3534.82,-59.18) 3575.82,-18.18 v3(3575.82,234)
  Bottom Layer w40: v3(2563.82,570.82) 2758.82,570.82 2801.82,527.82 v3(2803.81,527.82)
  other v1: 1754,511
VCC5V0_HOST1: J2.1 J3.1 U11.1 | length 385.7
  Top Layer w25: J2.1@400.52,2992.96 459.96,2992.96 v2(481,3014) ; J3.1@1429.93,2974.89 1429.93,2916.07 v3(1430,2916)
  Bottom Layer w22: v3(1430,2916) 1487,2973 1487,3130
VCC5V0_HOST_EN: R79.2 U10.R25 | length 3040.8
  Top Layer w4: v1(1591,1623) 1591,1622.61 1595.87,1617.74 U10.R25@1595.87,1604.33
  Top Layer w8: v2(889,2767.82) 889,3074 923,3108 v3@1064,3108
  Routing 1 w4: v2(889,2767.82) 664.82,2767.82 635,2738 635,2547 1539,1643 1571,1643 v1(1591,1623)
  Bottom Layer w22: v3(1064,3105) 1064,3366 1136,3438 1387,3438 1411,3414 R79.2@1411,3333
VCC5V0_TYPEC0_EN: R83.2 U10.M24 | length 2570.1
  Top Layer w4: v2(1529,1551) 1530,1550 1586.05,1550 1586.81,1550 cw(c1551.41,1458.61) 1604.15,1541.22 cw(c1544.37,1447.58) U10.M24@1621.46,1527.55
  Top Layer w12: v2(672,1627) 707,1662 v2(910,1662)
  Routing 4 w12: v3(138,2651) 138,2505 278,2365 278,1662 313,1627 v2(672,1627)
  Bottom Layer w4: v2(910,1662) 910,1644 981,1573 1218,1573 1234,1589 1521,1589 1529,1581 v2(1529,1551)
  Bottom Layer w12: v3(138,2651) R83.2@138,2707
VCC_1V5: C75.1 C77.1 R32.2 U9.2 U10.AC8 U10.J24 U10.N23 | length 2769.9
  Top Layer w6: U10.J24@1621.46,1450.78 1621.46,1452.67 1624.96,1456.17 1624.96,1457.18 v1@1630.39,1462.61 ; v1(1633.19,1540.58) 1633.84,1540.58 1646.4,1553.14 U10.N23@1647.05,1553.14 ; U9.2@1864.32,479.05 1864.32,609.32 1913.5,658.5 2131.5,658.5 2160.82,629.18 v2(2160.82,583) R32.2@2160.82,541.82 ; v1(2020.52,1798.52) U10.AC8@2031.04,1809.05
  Routing 4 w6: v2(2160.82,583) 2191,583 2252,644 2252,1355 2239.5,1367.5 2239.5,1467.5 v2(2239,1468)
  Routing 2 w4: v1(1630.62,1462.62) 1655.24,1438 2209,1438 v2(2239,1468)
  Bottom Layer w6: v1(2020.52,1798.52) 2037.04,1782 2203,1782 2234,1751 2234,1486 2239,1481 v2(2239,1468)
  Bottom Layer w12: v1(1630.62,1462.62) C75.1@1630.62,1498 ; C75.1@1631.5,1498 C77.1@1631.5,1538 1631.5,1538.91 C77.1@1633.17,1540.58
VCC_1V8: C51.1 C52.1 C82.1 C84.1 C86.1 C87.1 C88.1 C89.1 C90.1 C91.1 C146.1 C175.1 C176.1 C177.1 C178.1 C179.1 C235.1 C236.1 C237.1 C238.1 C241.1 C242.1 L11.2 P20.1 R1.2 R9.2 R12.2 R40.1 R42.2 R44.2 R96.1 R97.1 R98.1 R99.1 R104.2 R105.2 R111.2 R113.2 SB4.1 SB14.2 SB15.2 U10.AB8 U10.J22 U10.K24 U14.1 U14.24 U14.36 U14.48 U16.C6 U16.M4 U16.N4 U16.P3 U16.P5 U17.34 | length 16638.9
  Top Layer w6: U16.M4@646.66,1490.51 646.81,1490.67 658.67,1490.67 658.82,1490.82 ; 656.33,1490.82 658.82,1490.82 ; U16.C6@823.82,1451.14 784.14,1490.82 658.82,1490.82 ; v1(1610,1466) 1610.54,1466 1620.92,1476.37 U10.K24@1621.46,1476.37 ; U10.AB8@2030.91,1783.55 v1@2042.51,1795.15
  Top Layer w8: v1(593.82,1510.19) U16.P3@607.29,1510.19
  Top Layer w10: U16.N4@626.97,1490.51 U16.M4@646.66,1490.51 ; v2(637,2152) 729,2060 729,1790.19 v2(671,1732.19) ; v2(3111.82,1972.52) U17.34@3161.95,1972.52 ; v2@3233.82,3008.82 v2@3239.82,3002.82 ; v2(3236.82,3005.82) v2@3239.82,3002.82 ; U14.48@3277.65,2999.25 3249.39,2999.25 3245.82,3002.82 v2@3239.82,3002.82 ; U14.24@3494.18,2737.44 3494.18,2713.46 v1(3503,2704.64) ; U14.36@3516.82,2976.62 L11.2@3562.82,2976.62 ; L11.2@3562.82,2977.04 L11.2@3563.1,2977.32
  Top Layer w12: R44.2@1927.82,577.82 1927.82,606.82 1938,617 2126.32,617 2140,603.32 v2(2140,583)
  Top Layer w20: v3(282,643.08) R105.2@488.08,643.08 ; R1.2@2129.82,83.82 2129.82,171.64 v2(2151,192.82) ; v1(2314,1823.76) 2314,1802.21 C87.1@2314.32,1801.88 C88.1@2314.32,1762.57 C89.1@2314.32,1723.26 C90.1@2314.32,1683.95 C91.1@2314.32,1644.63 ; v1@2314.32,1823.76 C86.1@2314.32,1841.2 C84.1@2314.32,1880.51 2314.32,1939.32 2347.52,1972.52 v2(3111.82,1972.52) ; 3312.82,2637.82 3312.82,2623.82 v2@3323.82,2612.82 ; v2(3320.82,2612.82) 3323.82,2609.82 3323.82,2600.18 3396.82,2527.18 v2(3396.82,2415.82) R113.2@3325.82,2415.82 ; v2(3544.82,2976.62) 3519.82,3001.62 3519.82,3153.82 3601.82,3235.82 R104.2@4070.82,3235.82
  Top Layer w22: SB14.2@1960.09,2138.82 SB15.2@2013.49,2138.82 2015.99,2138.82 2019.99,2142.82 2019.99,2166.99 v2(2025,2172) ; v3@2162,450 2162.31,450.31 2162.31,487.31 SB4.1@2162.82,487.82 ; R12.2@2646.82,221.82 v2(2646.82,192.82) 2682.82,156.82 v3(2971,156.82) 3197.82,156.82 3239.74,198.74 3239.74,231.74 R9.2@3240.82,232.82 ; v3(2971,1497) v3(2971,1668.85)
  Routing 1 w12: v2(2151,192.82) v2(2646.82,192.82)
  Routing 1 w22: v3(2162,441) 2468,441 v2(2575,334)
  Routing 4 w6: v1(2042.51,1795.34) 2058.36,1811.19 2301.51,1811.19 v1(2314,1823.76)
  Routing 4 w10: v1(636.82,1490.82) 702,1556 702,1701.22 v2@671.61,1731.61 ; v2(671,1732.19) v2@671.58,1731.61
  Routing 4 w12: v2(3544.82,2976.62) 3592.03,2976.62 3629.82,2938.82 3629.82,2816.82 3590.82,2777.82 v2(3554.82,2777.82)
  Routing 4 w20: v2(3111.82,1972.52) 3360.52,1972.52 ; v2(3320.82,2612.82) 3466.82,2612.82 3503,2649 v1(3503,2704.64) ; v2(3396.82,2415.82) 3455,2357.64 3455,2067 3360.52,1972.52 ; v3(3552.82,1642.82) 3552.82,1780.22 3360.52,1972.52
  Routing 4 w22: v3(282,643.08) 282,1274 492.82,1484.82 v3(571.82,1484.82) ; v2(2025,2172) 2041.49,2188.49 2376.7,2188.49 2470.99,2094.19 v3(2470.99,1972.52) ; v3(2971,156.82) v3(2971,1497) ; v3(2971,1668.85) 2971,1831.7 v2(3111.82,1972.52)
  Routing 2 w12: v2(2140,583) 2140,463 v3(2162,441)
  Routing 3 w10: v2(637,2152) 664,2179 1340,2179 1378,2141 1994,2141 v2(2025,2172)
  Bottom Layer w8: v3(282,1058) 323,1099 457,1099 496,1138 1369,1138 1612,1381 1660,1381 1672.64,1393.64 1672.64,1429.64 ; C146.1@1619.82,1439.32 1662.96,1439.32 1672.64,1429.64 ; v1(1672.64,1450.78) 1672.64,1429.64
  Bottom Layer w10: 573.82,1469.82 574.82,1470.82 ; v2(3111.82,1972.52) 3128.12,1988.82 C242.1@3176.32,1988.82
  Bottom Layer w12: 574.82,1470.82 v1(607.29,1470.82) ; v2(2394,193) 2434,193 v2(2575,334) ; C178.1@3491.32,3014.82 3491.57,3014.57 3491.57,2977.07 C175.1@3491.82,2976.82 3544.62,2976.82 v2(3544.82,2976.62)
  Bottom Layer w20: R111.2@68.82,257.82 v3(113.82,257.82) ; C51.1@1716.87,0.33 C52.1@1716.87,78.33 1717.36,78.82 R40.1@1770.82,78.82 1770.82,118.28 1782.54,130 2088.18,130 v2(2151,192.82) ; 3272.32,2983.82 3298.32,2957.82 3369.82,2957.82 3393.82,2933.82 3474.82,2933.82 3491.82,2950.82 C175.1@3491.82,2976.82 ; v2(3320.82,2612.82) 3320.82,2677.41 3341.82,2698.41 R99.1@3341.82,2766.82 ; v1(3503,2704.64) 3503,2750.82 3508.75,2756.57 3516.57,2756.57 3529.32,2769.32 C177.1@3552.32,2769.32 ; C179.1@3507.82,2762.82 C179.1@3510.32,2762.82 ; C177.1@3552.32,2769.32 3553.82,2769.32 C177.1@3554.82,2770.32 3553.32,2770.32 C177.1@3552.32,2769.32
  Bottom Layer w22: v3(113.82,257.82) 207.82,257.82 243,293 243,604.08 v3(282,643.08)
VCC_3V0: C47.1 C48.1 P13.1 P27.1 Q3.1 Q4.1 Q5.1 R8.2 R41.1 R43.1 R54.2 R55.2 R90.2 R92.2 R94.2 U9.15 U9.17 U10.AC9 U10.K23 U10.P23 | length 2968.9
  Top Layer w6: v2(1582,566) 1590,574 1664,574 1685.19,552.81 U9.15@1685.19,479.05 ; C47.1@1609.46,516.11 1630.11,516.11 1642,528 1642,564 1633,573 ; v1(1634.25,1565.94) U10.P23@1647.05,1578.74 ; U10.K23@1647.05,1476.37 1647.05,1476.16 1659,1464.21 v1(1659,1464) ; 1652.99,487.86 1657.09,487.86 1657.63,487.31 U9.17@1657.63,479.05 ; U10.AC9@2005.32,1809.18 2012.66,1816.52 v1(2012.66,1816.66)
  Top Layer w15: C47.1@1609.46,516.11 1609.46,489.79 1618.25,481 1648.2,481
  Top Layer w20: P27.1@-42.18,1845.82 76.82,1845.82 255,2024 575.64,2024 P13.1@575.82,2023.82
  Routing 1 w6: v2(1516,1323) 1556,1323 1659,1426 v1(1659,1464) 1646.11,1476.89 1646.11,1554.08 v1(1634.25,1565.94)
  Routing 4 w20: v3(1457,438) 1457,68.13 1547.13,-22 1918,-22 1960,-64 v3(2178,-64)
  Bottom Layer w20: R54.2@1451.82,1332.82 R54.2@1458.82,1332.82 1510.32,1332.82 1515.32,1327.82 1515.32,1325.32 1516,1324.64 v2(1516,1323) ; v3(1457,438) 1456,439 1502.82,439 1503.64,439.82 R41.1@1510.32,439.82 C48.1@1563.82,439.82 ; R94.2@1897.82,2927.82 R94.2@1902.82,2922.82 ; Q5.1@1906.23,2979.5 1909,2982.27 v2(1909,3013) ; R90.2@2096.82,2927.82 2101.82,2922.82 2101.82,2908.78 2102,2908.61 v2(2102,2868.91) ; R8.2@2177.18,3.82 2177.59,3.41 2177.59,-63.59 v3(2178,-64) ; R92.2@2393.82,2927.82 2396,2925.64 v3(2396,2893) ; R92.2@2403,2930 R92.2@2407.03,2934.03
  other v2: 490,2024
VCC_3V3: C231.1 C232.1 C233.1 C234.1 J8.1 | length 211.8
  Bottom Layer w12: C233.1@804.82,1452.32 805.32,1452.32 C233.1@805.82,1452.82
  Bottom Layer w18: C231.1@688.32,1371.82 688.32,1438.32 700.9,1450.9 753.28,1450.9 ; v2(750,1426) 750,1440 762.32,1452.32 C233.1@804.82,1452.32
VCC_5V: C11.1 C14.1 C17.1 C21.1 C23.1 C33.1 C34.1 C55.1 C56.1 C57.1 C58.1 C60.1 C158.1 C163.1 C164.1 C165.1 ESD1.1 F1.1 FB1.2 J10.1 P21.1 R26.2 R93.1 R95.1 R114.2 U1.D1 U1.D2 U1.E1 U1.E2 U2.D1 U2.D2 U2.E1 U2.E2 U3.4 U4.3 U7.1 U9.23 U9.24 U9.44 U9.45 U9.59 U9.60 U11.5 U12.5 U13.12 U13.13 | length 4426.5
  Top Layer w6: 1901.5,338.3 1908.62,338.3 ; U9.59@1901.73,331.41 1908.62,338.3 ; 1910.32,340 1908.62,338.3 ; v3(1936.62,351.22) 1936.62,349.84 1925.08,338.3 1908.62,338.3
  Top Layer w20: 1597.82,383.82 v1(1597.82,390.82)
  Top Layer w22: v3@2387.82,-30.18 v3@2387.82,-26.18 ; v2@2991.82,640.82 v2@2992.91,640.82 ; v2(2992.91,641.82) v2@2992.91,640.82 ; C23.1@3020.82,640.82 v2@2992.91,640.82 ; v3@3269.82,-26.18 v3(3270.82,-25.18) ; v2(3368.82,669.82) 3368.82,760.82 3409.82,801.82 v2(3508.82,801.82)
  Top Layer w25: v3(1719,2983) 2018,2983 2091,2910 2138.18,2910 2165.82,2937.64 ; F1.1@2165.82,2979.36 2165.82,2937.64 ; v3(2568,3001) 2334,3001 2268,2935 v3(2268,2909) 2194.47,2909 2165.82,2937.64 ; v3(3550,1540) 3551.82,1541.82 P21.1@3551.82,1555.82
  Routing 1 w20: v3(1936.62,351.22) 1936.62,286.38 v2(1955.71,267.29)
  Routing 1 w25: v3(99.78,2937.86) 99.78,3263.78 224,3388 572,3388 ; v2(632,3116) 579,3116 518,3177 518,3334 572,3388 ; v3(1588,3133) 1256,3133 1001,3388 572,3388
  Bottom Layer w22: C55.1@1538.82,385.82 1543.82,390.82 v1(1597.82,390.82) 1658.82,390.82 1659.82,389.82 ; C158.1@1616,3131.5 1616,3086 v3(1719,2983) ; 1681.82,390.82 1684.82,393.82 ; C56.1@1766.82,422.88 C56.1@1768.87,420.83 ; v1(1790.82,156.82) 1790.82,174.82 1842.74,226.74 1842.74,270.32 1842.82,270.41 C34.1@1842.82,276.82 ; v3(3270.82,-25.18) 3271.13,-24.87 3271.13,8.13 C11.1@3272.82,9.82 ; v2(3508.82,801.82) 3509.22,801.42 R114.2@3509.22,798.82
  Bottom Layer w25: v3@1719.18,2982.82 R95.1@1773.82,2982.82 ; ESD1.1@1948.82,271.29 ESD1.1@1950.71,271.29 ; R93.1@2267.82,2982.82 2268,2982.64 v3(2268,2909)
  other v2: 2794.92,242.2 3415.07,242.2 4023.82,816.26
  other v3: 2387.82,-33.18
VCC_DDR: C131.1 C132.1 C133.1 C134.1 C135.1 C136.1 C137.1 C138.1 C139.1 C140.1 C200.1 C201.1 C202.1 C203.1 C204.1 C205.1 C206.1 C207.1 C220.1 C221.1 C222.1 C223.1 C224.1 C225.1 C226.1 C227.1 C228.1 C229.1 C249.1 C250.1 C251.1 C252.1 C253.1 C254.1 C255.1 C256.1 C257.1 C258.1 C260.1 C261.1 P19.1 R33.2 R37.1 R37.2 R45.1 R49.1 R108.2 SB3.1 U10.J11 U10.J12 U10.J13 U10.J14 U10.J15 U10.J16 U10.J17 U10.J18 U10.K11 U10.K13 U10.K15 U10.K17 U10.L9 U10.L10 U10.M9 U10.N9 U10.N10 U10.P9 U10.R9 U10.R10 U10.T9 U10.U9 U10.U10 U10.V9 U15.A4 U15.A9 U15.AB4 U15.AB9 U15.F5 U15.F8 U15.H1 U15.H5 U15.H8 U15.H12 U15.K1 U15.K3 U15.K10 U15.K12 U15.N1 U15.N3 U15.N10 U15.N12 U15.R1 U15.R5 U15.R8 U15.R12 U15.U5 U15.U8 U18.A4 U18.A9 U18.AB4 U18.AB9 U18.F5 U18.F8 U18.H1 U18.H5 U18.H8 U18.H12 U18.K1 U18.K3 U18.K10 U18.K12 U18.N1 U18.N3 U18.N10 U18.N12 U18.R1 U18.R5 U18.R8 U18.R12 U18.U5 U18.U8 | length 8487.7
  Top Layer w6: U15.F5@549.87,280 563.95,294.09 586.96,294.09 v1(601.05,280) ; U15.F8@549.87,374.49 565.35,359 585.56,359 v1(601.05,374.49) ; U18.H1@601.05,696.77 601.34,696.77 614.09,709.52 v1(614.38,709.52) ; U18.K12@652.23,1043.23 v1(673,1044) ; U10.J18@1775,1450.78 U10.J17@1800.59,1450.78 ; U10.K17@1800.59,1476.37 U10.J17@1800.59,1450.78 ; U10.K15@1851.77,1476.37 U10.J15@1851.77,1450.78 ; U10.K13@1902.96,1476.37 U10.J13@1902.96,1450.78 ; U10.N10@1979.73,1553.14 2005.07,1553.14 2005.19,1553.02 2005.19,1502.09 2005.07,1501.96 U10.L10@1979.73,1501.96 U10.K11@1954.14,1476.37 v1(1954.14,1450.78) U10.J12@1928.55,1450.78 U10.J13@1902.96,1450.78 ; U10.R10@1979.73,1604.33 U10.R9@2005.32,1604.33 ; U10.U10@1979.73,1655.51 U10.U9@2005.32,1655.51 ; U10.N9@2005.32,1553.14 U10.P9@2005.32,1578.74 U10.R9@2005.32,1604.33 ; U10.V9@2005.32,1681.1 U10.U9@2005.32,1655.51 ; U10.J17@1800.59,1450.78 1801.3,1450.08 1825.48,1450.08 U10.J16@1826.18,1450.78 U10.J15@1851.77,1450.78 ; U10.J15@1851.77,1450.78 U10.J14@1877.37,1450.78 U10.J13@1902.96,1450.78 ; U10.R9@2005.32,1604.33 U10.T9@2005.32,1629.92 2005.86,1630.46 2005.86,1654.97 U10.U9@2005.32,1655.51
  Top Layer w8: v1(652.23,437.48) 667.71,422 713.52,422 U15.N10@729,437.48 ; U18.K10@652.23,980.24 U18.N10@729,980.24 v1(729,980.49) ; v1(729,696.77) 745.77,680 763.41,680 U18.R1@780.18,696.77 ; U15.AB9@959.31,405.98 987.89,405.98 993,411.09 v1(993,440)
  Top Layer w10: v1(780,513) 780,500.53 U15.R12@780.05,500.47 ; U18.AB4@959.31,791.26 1025.74,791.26 v1(1045,772)
  Top Layer w12: R108.2@366,963 398.03,963 411.87,949.16 421.5,949.16 v1(421.91,948.74) 402,928.83 402,908.5 450.5,860 542.84,860 ; v1(375,248.5) U15.A4@421.91,248.5 ; v1(407,406) U15.A9@421.91,405.98 ; v1(549.87,822.76) 549.87,842 549.87,852.97 542.84,860 ; U18.F8@549.87,917.24 550,917.11 550,902.65 556.03,896.62 592.62,896.62 601.05,905.05 v1(601.05,917.24) ; U15.H1@601.05,154.02 v1(601,106) 658,106 ; U18.H5@601.05,822.76 601.05,848.95 590,860 542.84,860 ; C200.1@651,555 652.23,553.77 v1(652.23,500.47) ; U15.K1@652.23,154.02 652.23,111.77 658,106 ; v1(704,106) 658,106 ; v1(729,1043.23) 729.59,1043.23 746.67,1060.32 763.09,1060.32 U18.R12@780.18,1043.23 ; v1(771,907.47) 780.18,916.66 U18.R8@780.18,917.24 ; v1@771,908.06 771,898.03 778.03,891 824.33,891 831.36,898.03 U18.U8@831.36,917.24 ; U15.R8@780.18,374.49 v1(779.68,374.49) 779.77,374.4 779.77,372.54 779.68,372.45 779.68,357.03 786.71,350 824.33,350 831.36,357.03 v1(831.36,374.49) ; v1(780.18,822.76) 799.43,842 812.12,842 U18.U5@831.36,822.76 ; U18.AB9@959.31,948.74 v1@1026.8,948.74
  Top Layer w25: v3(40,1514) 250,1724 530.19,1724 575.82,1769.63 575.82,1767.82 P19.1@576.82,1766.82 ; v3(575.82,1767.69) P19.1@575.89,1767.76
  Routing 1 w12: v2(2191.89,1185.89) v2(2279.17,1185.89)
  Routing 1 w20: v3(2112.82,329.82) 2112.82,448.13 v3(2255.69,591)
  Routing 1 w22: v3(714,-31.5) 1992.95,-31.5 1994.06,-32.61 v3(1994.5,-32.61)
  Routing 1 w25: v3(40,1286) v3(40,1514)
  Routing 4 w10: v1(421.91,791.26) 407.08,806.09 407.08,933.91 v1(421.91,948.74)
  Routing 2 w8: v1(993,440) 1013,420 v1(1013,370)
  Routing 3 w12: v1(831.36,280) v1@831.36,373.9
  Bottom Layer w6: C201.1@667.97,500.47 C201.1@670.5,503
  Bottom Layer w8: v1(993,440) 993,414 C202.1@993.5,414
  Bottom Layer w10: C229.1@390,791.5 390.24,791.26 v1(421.91,791.26) ; C223.1@768.97,888.47 771,890.5 v1(771,907.47)
  Bottom Layer w12: C220.1@366,962 408.65,962 v1(421.91,948.74) ; C205.1@394,248.5 C256.1@356,248.5 ; v1(407,406) 368,406 356,394 C256.1@356,248.5 ; C206.1@600.77,128.27 C206.1@600.5,128 600.5,91.5 586,77 320,77 303,94 303,228 323.5,248.5 C256.1@356,248.5 ; v1(652.23,500.47) C201.1@667.97,500.47 ; v1(652.23,696.77) 652.23,665.27 C227.1@652.5,665 ; v1(652.23,759.76) 678.74,759.76 C260.1@679,759.5 ; C228.1@677,980.5 677.5,980 C222.1@705,980 ; C207.1@697,154.5 728.5,154.5 743,140 743,113.03 735.97,106 v1(704,106) ; C222.1@705,980.36 715,980.36 715.13,980.49 v1(729,980.49) ; v1(729,1043.23) v1@729.23,1043 ; C223.1@768.5,888 C223.1@768.97,888.47 ; v1(831.36,280) C204.1@831.36,307.6 ; v1(959.31,248.5) 965.32,242.5 1015.97,242.5 1023,249.53 v1(1023,272) ; 1967.88,1201.33 1932.06,1237.15 1932.06,1428.71 v1(1954.14,1450.78) 1990.22,1450.78 2015,1426 R45.1@2054,1426 ; C138.1@2083.04,1192.32 C136.1@2158.82,1192.32 ; C137.1@2120.93,1192.32 C136.1@2158.82,1192.32 ; R49.1@2207.89,1185.89 2206.82,1184.82 2199.32,1192.32 C136.1@2158.82,1192.32
  Bottom Layer w20: v3(2112.82,329.82) R37.2@2149.82,329.82 R37.1@2209.82,329.82 ; v3(2255.69,591) 2348,683.31 2348,1131.31 2293.42,1185.89 v2(2279.17,1185.89)
  Bottom Layer w22: 1778,1052 1778,1194 ; C131.1@1967.88,1194.32 1967.88,1201.33 ; v3(1994.5,-32.61) 2033.41,6.3 2033.41,7.41 2209.82,183.82 R37.1@2209.82,329.82
  other v1: 728.37,154.02 780.06,154.84 728.87,217.01 651.01,217.58 780.31,280 601.05,500.47 729.1,500.37 729,759.76 550,903.65 1026.92,948.61 601,1043
VCC_DDRC: C188.1 C189.1 C190.1 C191.1 C192.1 C193.1 C194.1 C195.1 C208.1 C209.1 C210.1 C211.1 C212.1 C213.1 C214.1 C215.1 R46.1 R106.2 R107.1 R108.1 R109.2 R110.1 R126.1 U15.AA3 U15.AA5 U15.AA8 U15.AA10 U15.B3 U15.B5 U15.B8 U15.B10 U15.D1 U15.D5 U15.D8 U15.D12 U15.F3 U15.F10 U15.U3 U15.U10 U15.W1 U15.W5 U15.W8 U15.W12 U18.AA3 U18.AA5 U18.AA8 U18.AA10 U18.B3 U18.B5 U18.B8 U18.B10 U18.D1 U18.D5 U18.D8 U18.D12 U18.F3 U18.F10 U18.U3 U18.U10 U18.W1 U18.W5 U18.W8 U18.W12 | length 1606.3
  Top Layer w5: U18.D12@498.69,1043.23 498.84,1043.39 498.84,1095.84 v1(499,1096)
  Top Layer w6: v1(535.94,746.97) 536.51,746.97 549.3,759.76 U18.F3@549.87,759.76 ; v1(817.68,204) 830.69,217.01 U15.U3@831.36,217.01 ; U18.U3@830,759 830.58,759.58 v1(831.55,759.58) ; U15.AA3@933.72,217.01 933.72,216.64 949,201.37 v1(949,201) ; U18.AA3@933.72,759.76 v1(946.52,772.56)
  Top Layer w8: v1(498.69,374.49) 498.69,359.32 510,348 552,348 581,319 595.97,319 596.24,319.27 613.27,319.27 v2(614,320) ; v1(875,535) 875,534.5 882.54,526.96 U15.W12@882.54,500.47 ; U15.W8@882.54,374.49 882.27,374.22 882.27,349.27 v1(882,349) 926,349 933.72,356.72 U15.AA8@933.72,374.49
  Top Layer w10: v1(439,447) 447.5,438.5 U15.B10@447.5,438.07 ; v1(447.5,917.24) 468.95,895.8 477.24,895.8 U18.D8@498.69,917.24 ; v1(498.69,110.68) U15.D1@498.69,154.02
  Top Layer w12: R108.1@366,903 365.5,902.5 365.5,860 365,859.5 410.76,859.5 v1(447.5,822.76) ; U15.B10@447.5,437.48 U15.B10@447.5,438.07 ; U15.D5@498.69,280 498.69,313.68 v1(506,321) ; U18.U10@831.36,980.24 v1(839,990) ; U15.W1@882.54,154.02 882.54,126.46 v1(909,100) ; U18.AA10@933.72,980.24 v1(941,970)
  Routing 1 w5: v1(447.5,980.24) 447.5,1074.5 469,1096 v1(499,1096)
  Bottom Layer w6: R126.1@768,728 768,756.49 771.51,760 831.12,760 v1(831.55,759.58) ; v1(946.52,772.56) 1006.56,772.56 C208.1@1009,775
  Bottom Layer w8: v2(614,320) 615.03,320 616.03,319 635.81,319 640.5,323.69 C195.1@640.5,344
  Bottom Layer w10: C214.1@867.5,1041 869.72,1043.22 v1(882.44,1043.22)
  Bottom Layer w12: R109.2@422,851.5 425,848.5 428.5,848.5 447.5,829.5 v1(447.5,822.76) ; R106.2@458.5,345 R46.1@458.5,307 C192.1@498.5,307 C191.1@498.5,345 498.5,374.3 v1(498.69,374.49) ; C188.1@501.87,518.48 512.37,528.98 C188.1@512.87,528.98 ; v1(549.47,217.01) 549.87,216.61 R110.1@549.87,187.63 ; C213.1@857.5,890 C212.1@888.5,890 ; C210.1@876.5,822.76 876.5,876.47 883.53,883.5 C212.1@885.5,883.5 ; C210.1@877.5,812.5 882.54,817.54 v1(882.54,822.76) ; C211.1@879.5,850 879.5,858.5 882.54,861.54 v1(882.54,917.24) ; v1(882,349) 882,347.5 C194.1@882.5,347
  other v1: 447.38,217.01 447.25,280 882.54,280 933.72,280 447.5,374.49 549.87,437.48 831.36,437.48 933.72,437.48 498.69,500.47 498.58,696.77 882.54,696.77 447.5,759.76 498.43,822.76 933.72,822.76 933.72,917.24 549.87,980.24
VCC_EFUSE: C3.1 C4.1 P1.1 R65.1 U6.5 U10.AD23 | length 5774.4
  Top Layer w20: v3(95,1917) 95,2178 454.82,2537.82 P1.1@576.82,2537.82
  Top Layer w22: v2(2774,1934) 2774,1855 2920,1709 v3(2920,1497) ; U6.5@2909,77.22 2909.41,76.82 v3(2938.82,76.82)
  Routing 4 w5: v3(1027,1917) 1048.77,1917 1059.27,1927.5 1481.59,1927.5 1493.9,1915.19 1515.85,1915.19 1595.64,1835.41 v1(1647.05,1835.41) 1658.46,1824 1810,1824 1860,1774 2688,1774 2774,1860 v2(2774,1934)
  Routing 4 w22: v3@2920,1502 v3(2920,1497) 2920,643.48 2938.82,624.66 v3(2938.82,76.82)
  Bottom Layer w4: v2(1665,1889) 1671,1883 R65.1@1671,1880.5
  Bottom Layer w6: v1(1647.05,1835.41) 1647.05,1856.55 R65.1@1671,1880.5
  Bottom Layer w22: v3(95,1917) v3@1026.56,1917
VCC_RTC: D29.3 P12.1 R35.1 R36.1 U9.9 | length 3674.2
  Top Layer w5: U9.9@1767.87,479.05 1767.87,624.87 1812,669 2386,669 2546,829 v2(2586,829)
  Top Layer w6: v2(2070.67,172.33) R36.1@2071.87,172.33
  Top Layer w20: P12.1@3118.62,826.82 3190.62,754.82 3256.82,754.82 3531.82,1029.82 3770.82,1029.82 3789,1048 3789,1097.59 3803.64,1112.23 D29.3@3821.44,1112.23
  Routing 4 w12: v2(2070.67,172.33) 2502.33,172.33 2617,287 2617,798 v2(2586,829)
  Bottom Layer w12: v2(2586,829) 2614,857 3115,857 v2(3133,839)